# Altium PCB LEDControl1.PcbDoc (part 4 of 6)
Units mm, origin at the board's own origin, x right, y up, seen from the top; angles counter-clockwise.
Board outline 380 x 185 mm, 2 copper layers (Top Layer, Bottom Layer), stack 0.533 mm thick; 673 components, 368 nets, 1993 pads, 2553 vias.
Unrouted connection lines stored in the file: 1155.
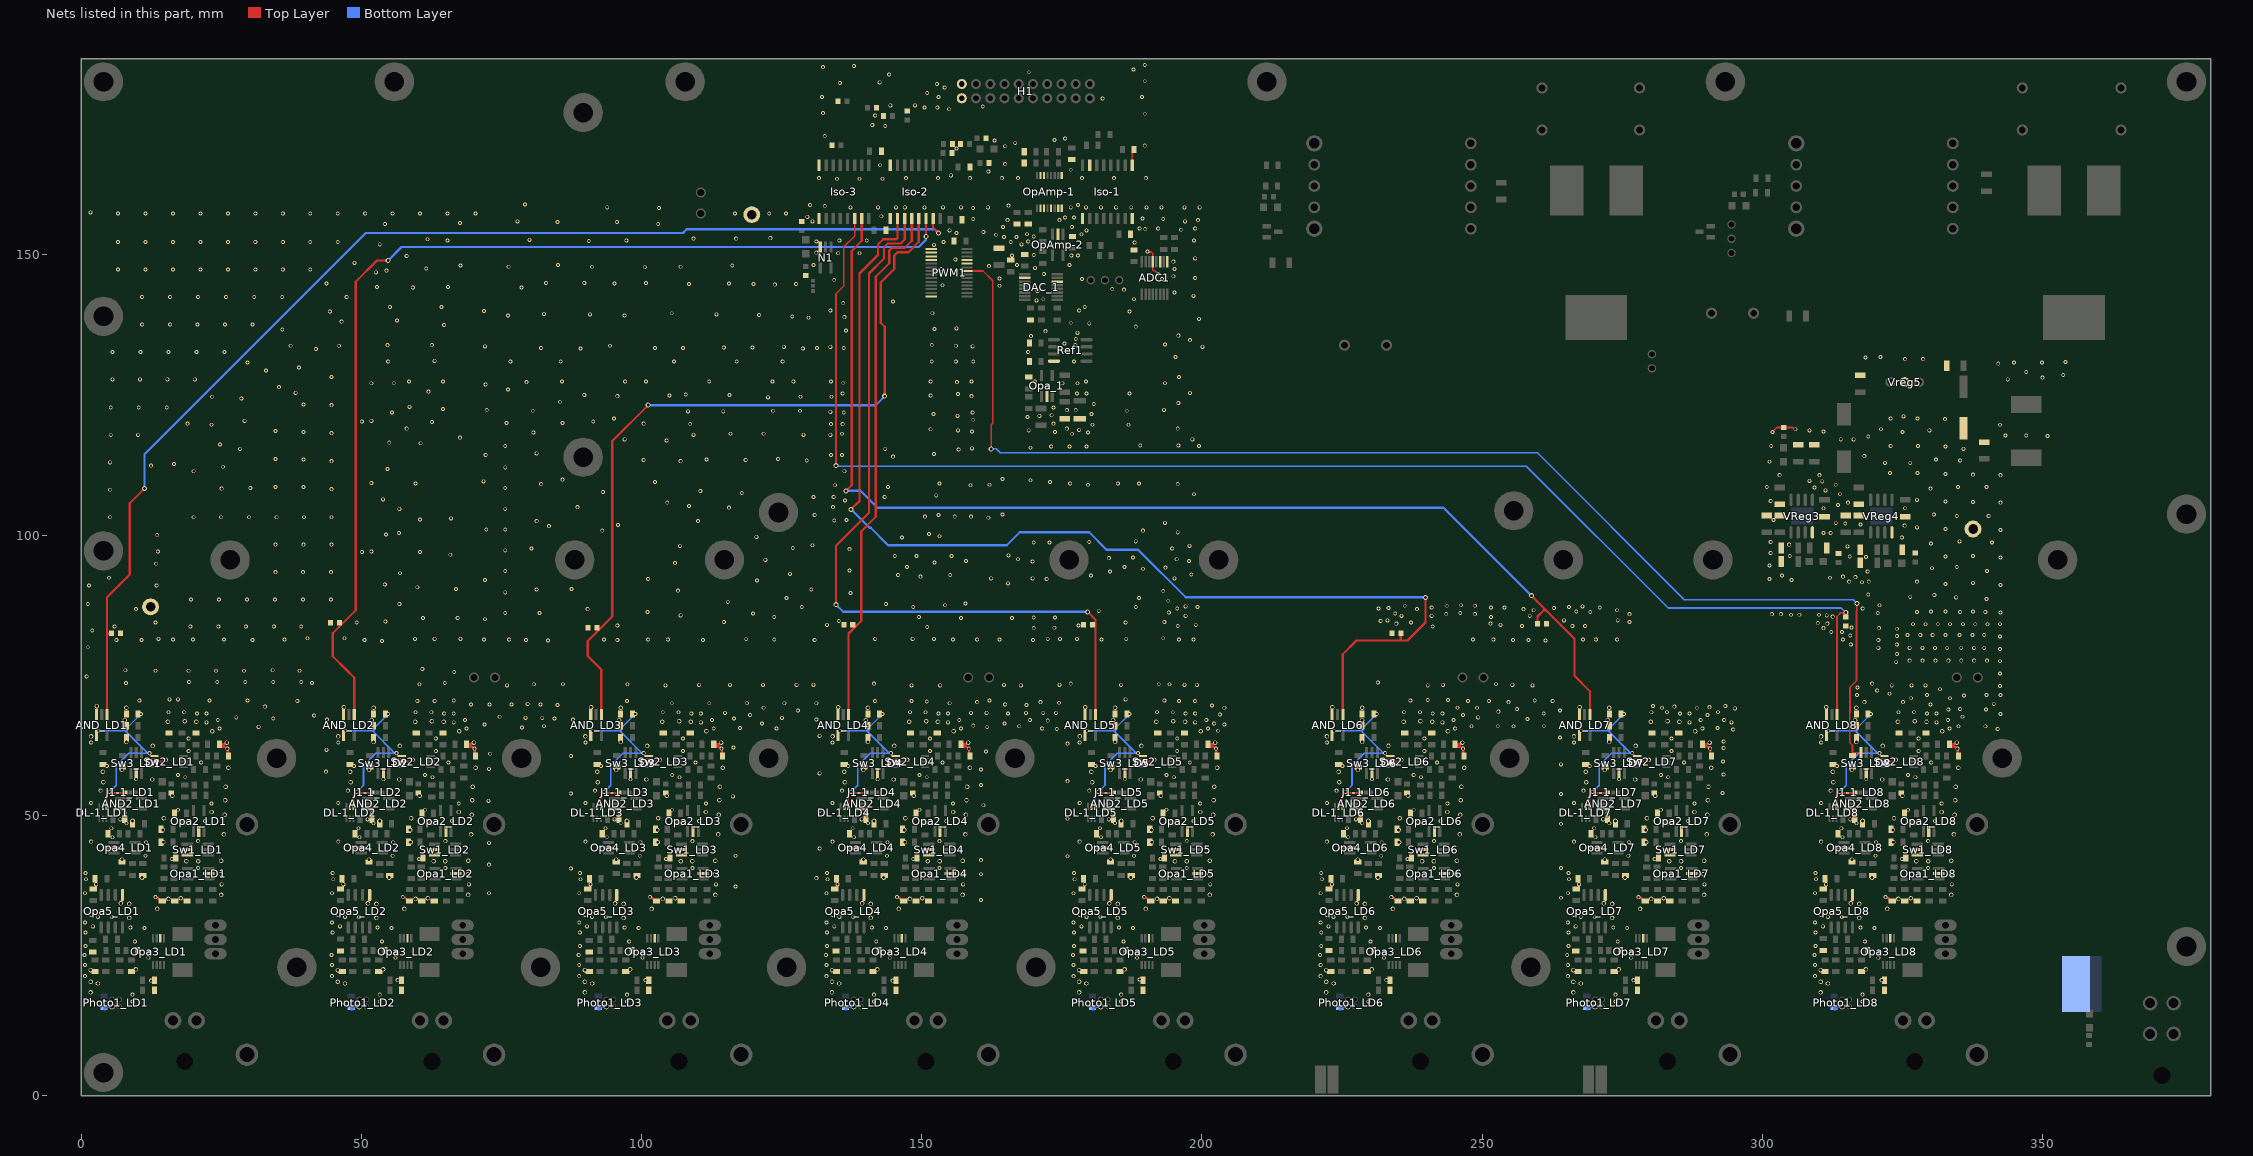
[diagram p4: the nets of this part, all layers, seen from the top]

## Via types
v1: diameter 0.7, hole 0.4, Top Layer to Bottom Layer, tented both sides, 1874 vias
v2: diameter 0.8, hole 0.5, Top Layer to Bottom Layer, tented both sides, 512 vias
v3: diameter 0.9, hole 0.5, Top Layer to Bottom Layer, tented both sides, 158 vias
v4: diameter 1.27, hole 0.711, Top Layer to Bottom Layer, tented both sides, 8 vias
v5: diameter 1.2, hole 0.7, Top Layer to Bottom Layer, tented both sides, 1 vias

## Nets (pads, with @x,y where several pads share a name; then routed paths per layer and width w, separated by ;. In a path a pad name is that pad's centre, name@x,y a point inside that pad or via, vN(x,y) a via of type N, cw(c..) or ccw(c..) an arc to the next point about the centre after c; other vN are vias at no path point) (continued)
DB8: PWM1.22 R7-5_LD8.1 Sw3_LD8.6 | length 230.8
  Top Layer w0.3: PWM1.22@158.1,147.15 160.95,147.15 162.682,145.418 162.682,119.982 162.4,119.7 v3(162.4,115.4) ; R7-5_LD8.1@315.8,60.8 R7-5_LD8.1@315.9,60.9 ; R7-5_LD8.1@316.1,60.8 316.1,61.2 ; v3(316.9,87.8) 316.869,87.769 316.869,86.569 316.8,86.5 316.8,74 315.65,72.85 315.65,68.307 315.6,68.257 315.6,63 316.1,62.5 316.1,61.2 ; Sw3_LD8.6@317.6,61.2 316.1,61.2
  Bottom Layer w0.3: v3(162.4,115.4) 163.3,115.4 164,114.7 259.9,114.7 286.1,88.5 316.2,88.5 v3(316.9,87.8)
EN1: AND_LD1.1 Iso-2.15 RPD_LD1.1 | length 211.6
  Top Layer w0.4: AND_LD1.1@4.634,68.016 4.634,82.4 ; RPD_LD1.1@5.4,82.5 5.3,82.4 4.634,82.4 ; v3(11.3,108.3) 8.7,105.7 8.7,93 4.634,88.934 4.634,82.4 ; Iso-2.15@152.04,156.5 152.04,154.86 v3(153,153.9)
  Bottom Layer w0.4: v3(11.3,108.3) 11.3,114.4 50.8,153.9 107.4,153.9 108.1,154.6 152.3,154.6 v3(153,153.9)
EN2: AND_LD2.1 Iso-2.14 RPD_LD2.1 | length 189.2
  Top Layer w0.4: AND_LD2.1@48.734,68.016 48.734,74.566 47.275,76.025 44.9,78.4 44.9,82.5 46.075,83.675 49,86.6 49,145.2 52.8,149 v3(54.8,149) ; Iso-2.14@150.77,156.5 150.789,156.481 150.789,153.306 v3(150.808,153.287)
  Bottom Layer w0.4: v3(54.8,149) 57.2,151.4 149.489,151.4 150.75,152.66 150.75,153.229 v3(150.808,153.287)
EN3: AND_LD3.1 Iso-2.13 RPD_LD3.1 | length 139.5
  Top Layer w0.4: AND_LD3.1@92.834,68.016 92.834,76.019 90.4,78.453 90.4,81.1 92.075,82.775 94.8,85.5 94.8,116.8 v3(101.2,123.2) ; v3(143.4,124.8) 143.4,137.2 142.7,137.9 142.7,145.1 145.1,147.5 145.1,149.9 145.7,150.5 147.659,150.5 149.5,152.341 Iso-2.13@149.5,156.5
  Bottom Layer w0.4: v3(101.2,123.2) 141.8,123.2 v3(143.4,124.8)
EN4: AND_LD4.1 Iso-2.12 RPD_LD4.1 | length 94.5
  Top Layer w0.4: AND_LD4.1@136.934,68.016 136.934,82.434 139.2,84.7 139.2,100.665 141.8,103.265 141.8,146.112 144.2,148.512 144.2,150.8 144.7,151.3 146.988,151.3 148.23,152.542 Iso-2.12@148.23,156.5
EN5: AND_LD5.1 Iso-2.11 RPD_LD5.1 | length 139.7
  Top Layer w0.4: v3(134.7,87.6) 134.7,98.1 140.6,104 140.6,146.7 143.3,149.4 143.3,151.4 143.952,152.052 146.248,152.052 146.96,152.764 Iso-2.11@146.96,156.5 ; v3(179.617,86.313) 181.034,84.897 AND_LD5.1@181.034,68.016
  Bottom Layer w0.4: v3(134.7,87.6) 135.987,86.313 v3(179.617,86.313)
EN6: AND_LD6.1 Iso-2.10 RPD_LD6.1 | length 201.3
  Top Layer w0.4: v3(137.4,104.6) 138.9,106.1 138.9,146.7 142.2,150 142.2,151.9 143.121,152.821 145.479,152.821 145.69,153.031 Iso-2.10@145.69,156.5 ; AND_LD6.1@225.134,68.016 225.134,78.734 227.6,81.2 235.7,81.2 ; RPD_LD6.1@235.5,82.5 235.5,81.4 235.7,81.2 ; v3(239.9,88.9) 239.9,84.4 236.7,81.2 235.7,81.2
  Bottom Layer w0.4: v3(137.4,104.6) 140.698,101.302 140.898,101.302 144,98.2 165.2,98.2 167.5,100.5 179.9,100.5 183,97.4 188.6,97.4 197.1,88.9 v3(239.9,88.9)
EN7: AND_LD7.1 Iso-3.15 RPD_LD7.1 | length 208.6
  Top Layer w0.4: v3(136.5,107.9) 137.521,108.921 137.521,150.721 139.31,152.51 Iso-3.15@139.31,156.5 ; v3(258.8,89.2) 261.4,86.6 ; RPD_LD7.1@259.9,84.15 RPD_LD7.1@259.9,84.2 259.9,85.5 261,86.6 261.4,86.6 ; AND_LD7.1@269.234,68.016 269.234,72.166 266.5,74.9 266.5,81.5 261.4,86.6
  Bottom Layer w0.4: v3(136.5,107.9) 136.508,107.908 139.092,107.908 142.1,104.9 243.1,104.9 v3(258.8,89.2)
EN8: AND_LD8.1 Iso-3.14 RPD_LD8.1 | length 256.7
  Top Layer w0.3: v3(134.7,112.4) 134.7,143.06 136.1,144.46 136.1,151.436 138.04,153.376 Iso-3.14@138.04,156.5 ; 313.334,69.411 313.334,85.494 314,86.16 314.86,86.16 v3(314.9,86.2) RPD_LD8.1@314.9,85.4
  Top Layer w0.4: AND_LD8.1@313.334,68.016 313.334,69.411
  Bottom Layer w0.3: v3(134.7,112.4) 134.8,112.3 257.9,112.3 283.2,87 314.1,87 v3(314.9,86.2)
Enable_LD1: AND_LD1.4 DL-1_LD1.1 J1-1_LD1.1 R7-6_LD1.1 Sw2_LD1.1 | length 34.5
  Top Layer w0.3: AND_LD1.4@2.7,64.7 v1(3.1,65.1) ; DL-1_LD1.1@4.55,51.6 4.55,53.65 v1(5.1,54.2) 5.208,54.2 5.408,54 J1-1_LD1.1@7.9,54 ; R7-6_LD1.1@10.2,68.1 v1(10.7,68.1) ; v1@12.277,60.823 12.5,60.6 Sw2_LD1.1@13.1,60.6
  Bottom Layer w0.3: v1(3.1,65.1) 7.9,65.1 ; v1(5.1,54.2) 6.3,55.4 6.3,58.9 8.5,61.1 v1@11.9,61.1 ; v1(10.7,68.1) 8.2,65.6 8.2,65.1 7.9,65.1 ; v1(12.2,61.1) v1@11.9,61.1 ; 7.9,65.1 v1@11.9,61.1
Enable_LD2: AND_LD2.4 DL-1_LD2.1 J1-1_LD2.1 R7-6_LD2.1 Sw2_LD2.1 | length 34.5
  Top Layer w0.3: AND_LD2.4@46.8,64.7 v1(47.2,65.1) ; DL-1_LD2.1@48.65,51.6 48.65,53.65 v1(49.2,54.2) 49.308,54.2 49.508,54 J1-1_LD2.1@52,54 ; R7-6_LD2.1@54.3,68.1 v1(54.8,68.1) ; v1@56.377,60.823 56.6,60.6 Sw2_LD2.1@57.2,60.6
  Bottom Layer w0.3: v1(47.2,65.1) 52,65.1 ; v1(49.2,54.2) 50.4,55.4 50.4,58.9 52.6,61.1 v1@56,61.1 ; v1(54.8,68.1) 52.3,65.6 52.3,65.1 52,65.1 ; v1(56.3,61.1) v1@56,61.1 ; 52,65.1 v1@56,61.1
Enable_LD3: AND_LD3.4 DL-1_LD3.1 J1-1_LD3.1 R7-6_LD3.1 Sw2_LD3.1 | length 34.5
  Top Layer w0.3: AND_LD3.4@90.9,64.7 v1(91.3,65.1) ; DL-1_LD3.1@92.75,51.6 92.75,53.65 v1(93.3,54.2) 93.408,54.2 93.608,54 J1-1_LD3.1@96.1,54 ; R7-6_LD3.1@98.4,68.1 v1(98.9,68.1) ; v1@100.477,60.823 100.7,60.6 Sw2_LD3.1@101.3,60.6
  Bottom Layer w0.3: v1(91.3,65.1) 96.1,65.1 ; v1(93.3,54.2) 94.5,55.4 94.5,58.9 96.7,61.1 v1@100.1,61.1 ; v1(98.9,68.1) 96.4,65.6 96.4,65.1 96.1,65.1 ; v1(100.4,61.1) v1@100.1,61.1 ; 96.1,65.1 v1@100.1,61.1
Enable_LD4: AND_LD4.4 DL-1_LD4.1 J1-1_LD4.1 R7-6_LD4.1 Sw2_LD4.1 | length 34.5
  Top Layer w0.3: AND_LD4.4@135,64.7 v1(135.4,65.1) ; DL-1_LD4.1@136.85,51.6 136.85,53.65 v1(137.4,54.2) 137.508,54.2 137.708,54 J1-1_LD4.1@140.2,54 ; R7-6_LD4.1@142.5,68.1 v1(143,68.1) ; v1@144.577,60.823 144.8,60.6 Sw2_LD4.1@145.4,60.6
  Bottom Layer w0.3: v1(135.4,65.1) 140.2,65.1 ; v1(137.4,54.2) 138.6,55.4 138.6,58.9 140.8,61.1 v1@144.2,61.1 ; v1(143,68.1) 140.5,65.6 140.5,65.1 140.2,65.1 ; v1(144.5,61.1) v1@144.2,61.1 ; 140.2,65.1 v1@144.2,61.1
Enable_LD5: AND_LD5.4 DL-1_LD5.1 J1-1_LD5.1 R7-6_LD5.1 Sw2_LD5.1 | length 34.5
  Top Layer w0.3: AND_LD5.4@179.1,64.7 v1(179.5,65.1) ; DL-1_LD5.1@180.95,51.6 180.95,53.65 v1(181.5,54.2) 181.608,54.2 181.808,54 J1-1_LD5.1@184.3,54 ; R7-6_LD5.1@186.6,68.1 v1(187.1,68.1) ; v1@188.677,60.823 188.9,60.6 Sw2_LD5.1@189.5,60.6
  Bottom Layer w0.3: v1(179.5,65.1) 184.3,65.1 ; v1(181.5,54.2) 182.7,55.4 182.7,58.9 184.9,61.1 v1@188.3,61.1 ; v1(187.1,68.1) 184.6,65.6 184.6,65.1 184.3,65.1 ; v1(188.6,61.1) v1@188.3,61.1 ; 184.3,65.1 v1@188.3,61.1
Enable_LD6: AND_LD6.4 DL-1_LD6.1 J1-1_LD6.1 R7-6_LD6.1 Sw2_LD6.1 | length 34.5
  Top Layer w0.3: AND_LD6.4@223.2,64.7 v1(223.6,65.1) ; DL-1_LD6.1@225.05,51.6 225.05,53.65 v1(225.6,54.2) 225.708,54.2 225.908,54 J1-1_LD6.1@228.4,54 ; R7-6_LD6.1@230.7,68.1 v1(231.2,68.1) ; v1@232.777,60.823 233,60.6 Sw2_LD6.1@233.6,60.6
  Bottom Layer w0.3: v1(223.6,65.1) 228.4,65.1 ; v1(225.6,54.2) 226.8,55.4 226.8,58.9 229,61.1 v1@232.4,61.1 ; v1(231.2,68.1) 228.7,65.6 228.7,65.1 228.4,65.1 ; v1(232.7,61.1) v1@232.4,61.1 ; 228.4,65.1 v1@232.4,61.1
Enable_LD7: AND_LD7.4 DL-1_LD7.1 J1-1_LD7.1 R7-6_LD7.1 Sw2_LD7.1 | length 34.5
  Top Layer w0.3: AND_LD7.4@267.3,64.7 v1(267.7,65.1) ; DL-1_LD7.1@269.15,51.6 269.15,53.65 v1(269.7,54.2) 269.808,54.2 270.008,54 J1-1_LD7.1@272.5,54 ; R7-6_LD7.1@274.8,68.1 v1(275.3,68.1) ; v1@276.877,60.823 277.1,60.6 Sw2_LD7.1@277.7,60.6
  Bottom Layer w0.3: v1(267.7,65.1) 272.5,65.1 ; v1(269.7,54.2) 270.9,55.4 270.9,58.9 273.1,61.1 v1@276.5,61.1 ; v1(275.3,68.1) 272.8,65.6 272.8,65.1 272.5,65.1 ; v1(276.8,61.1) v1@276.5,61.1 ; 272.5,65.1 v1@276.5,61.1
Enable_LD8: AND_LD8.4 DL-1_LD8.1 J1-1_LD8.1 R7-6_LD8.1 Sw2_LD8.1 | length 34.5
  Top Layer w0.3: AND_LD8.4@311.4,64.7 v1(311.8,65.1) ; DL-1_LD8.1@313.25,51.6 313.25,53.65 v1(313.8,54.2) 313.908,54.2 314.108,54 J1-1_LD8.1@316.6,54 ; R7-6_LD8.1@318.9,68.1 v1(319.4,68.1) ; v1@320.977,60.823 321.2,60.6 Sw2_LD8.1@321.8,60.6
  Bottom Layer w0.3: v1(311.8,65.1) 316.6,65.1 ; v1(313.8,54.2) 315,55.4 315,58.9 317.2,61.1 v1@320.6,61.1 ; v1(319.4,68.1) 316.9,65.6 316.9,65.1 316.6,65.1 ; v1(320.9,61.1) v1@320.6,61.1 ; 316.6,65.1 v1@320.6,61.1
GND: ADC1.9 ADC1.11 ADC1.13 AND2_LD1.3 AND2_LD2.3 AND2_LD3.3 AND2_LD4.3 AND2_LD5.3 AND2_LD6.3 AND2_LD7.3 AND2_LD8.3 AND_LD1.3 AND_LD2.3 AND_LD3.3 AND_LD4.3 AND_LD5.3 AND_LD6.3 AND_LD7.3 AND_LD8.3 C1-1_LD1.1 C1-1_LD2.1 C1-1_LD3.1 C1-1_LD4.1 C1-1_LD5.1 C1-1_LD6.1 C1-1_LD7.1 C1-1_LD8.1 C1-2.2 C1-4.1 C1-6.1 C1-7.2 C1-10.1 C1-11.1 C1-12.2 C1-13.1 C1-14.2 C1-16.1 C1-99.1 C2-1.2 C2-2.2 C2-3.1 C2-3_LD1.1 C2-3_LD2.1 C2-3_LD3.1 C2-3_LD4.1 C2-3_LD5.1 C2-3_LD6.1 C2-3_LD7.1 C2-3_LD8.1 C2-4.1 C2-4_LD1.1 C2-4_LD2.1 C2-4_LD3.1 C2-4_LD4.1 C2-4_LD5.1 C2-4_LD6.1 C2-4_LD7.1 C2-4_LD8.1 C2-5.1 C2-5_LD1.2 C2-5_LD2.2 C2-5_LD3.2 C2-5_LD4.2 C2-5_LD5.2 C2-5_LD6.2 C2-5_LD7.2 C2-5_LD8.2 C2-6.2 C2-6_LD1.2 C2-6_LD2.2 C2-6_LD3.2 C2-6_LD4.2 C2-6_LD5.2 C2-6_LD6.2 C2-6_LD7.2 C2-6_LD8.2 C2-7.1 C2-7_LD1.2 C2-7_LD2.2 C2-7_LD3.2 C2-7_LD4.2 C2-7_LD5.2 C2-7_LD6.2 C2-7_LD7.2 C2-7_LD8.2 C2-12.2 C2-13.2 C2-14.2 C2-15.2 C2-16.1 C2-17.1 C2-18.1 C2-19.2 C2-20.2 C2-21.2 C2-22.1 C2-23.1 C3-1.2 C3-1_LD1.1 C3-1_LD2.1 C3-1_LD3.1 C3-1_LD4.1 C3-1_LD5.1 C3-1_LD6.1 C3-1_LD7.1 C3-1_LD8.1 C3-2_LD1.2 C3-2_LD2.2 C3-2_LD3.2 C3-2_LD4.2 C3-2_LD5.2 C3-2_LD6.2 C3-2_LD7.2 C3-2_LD8.2 C4-1.2 C4-1_LD1.1 C4-1_LD2.1 C4-1_LD3.1 C4-1_LD4.1 C4-1_LD5.1 C4-1_LD6.1 C4-1_LD7.1 C4-1_LD8.1 C4-2_LD1.1 C4-2_LD2.1 C4-2_LD3.1 C4-2_LD4.1 C4-2_LD5.1 C4-2_LD6.1 C4-2_LD7.1 C4-2_LD8.1 C4-3_LD1.2 C4-3_LD2.2 C4-3_LD3.2 C4-3_LD4.2 C4-3_LD5.2 C4-3_LD6.2 C4-3_LD7.2 C4-3_LD8.2 C4-4_LD1.2 C4-4_LD2.2 C4-4_LD3.2 C4-4_LD4.2 C4-4_LD5.2 C4-4_LD6.2 C4-4_LD7.2 C4-4_LD8.2 C4-5_LD1.2 C4-5_LD2.2 C4-5_LD3.2 C4-5_LD4.2 C4-5_LD5.2 C4-5_LD6.2 C4-5_LD7.2 C4-5_LD8.2 C4-6_LD1.2 C4-6_LD2.2 C4-6_LD3.2 C4-6_LD4.2 C4-6_LD5.2 C4-6_LD6.2 C4-6_LD7.2 C4-6_LD8.2 C4-7_LD1.2 C4-7_LD2.2 C4-7_LD3.2 C4-7_LD4.2 C4-7_LD5.2 C4-7_LD6.2 C4-7_LD7.2 C4-7_LD8.2 C4-8_LD1.2 C4-8_LD2.2 C4-8_LD3.2 C4-8_LD4.2 C4-8_LD5.2 C4-8_LD6.2 C4-8_LD7.2 C4-8_LD8.2 C5-1.1 C5-1_LD1.1 C5-1_LD2.1 C5-1_LD3.1 C5-1_LD4.1 C5-1_LD5.1 C5-1_LD6.1 C5-1_LD7.1 C5-1_LD8.1 CE-7.2 DAC_1.2 DAC_1.14 DL-1_LD1.2 DL-1_LD2.2 DL-1_LD3.2 DL-1_LD4.2 DL-1_LD5.2 DL-1_LD6.2 DL-1_LD7.2 DL-1_LD8.2 Iso-1.9 Iso-1.16 Iso-2.9 Iso-3.9 JG.2 N1.3 Opa1_LD1.2 Opa1_LD2.2 Opa1_LD3.2 Opa1_LD4.2 Opa1_LD5.2 Opa1_LD6.2 Opa1_LD7.2 Opa1_LD8.2 Opa2_LD1.2 Opa2_LD2.2 Opa2_LD3.2 Opa2_LD4.2 Opa2_LD5.2 Opa2_LD6.2 Opa2_LD7.2 Opa2_LD8.2 Opa3_LD1.2 Opa3_LD2.2 Opa3_LD3.2 Opa3_LD4.2 Opa3_LD5.2 Opa3_LD6.2 Opa3_LD7.2 Opa3_LD8.2 Opa4_LD1.2 Opa4_LD2.2 Opa4_LD3.2 Opa4_LD4.2 Opa4_LD5.2 Opa4_LD6.2 Opa4_LD7.2 Opa4_LD8.2 Opa5_LD1.5 Opa5_LD2.5 Opa5_LD3.5 Opa5_LD4.5 Opa5_LD5.5 Opa5_LD6.5 Opa5_LD7.5 Opa5_LD8.5 Opa_1.2 OpAmp-1.2 OpAmp-1.3 OpAmp-1.5 OpAmp-1.7 OpAmp-1.8 OpAmp-2.2 Photo1_LD1.2 Photo1_LD2.2 Photo1_LD3.2 Photo1_LD4.2 Photo1_LD5.2 Photo1_LD6.2 Photo1_LD7.2 Photo1_LD8.2 PWM1.1 PWM1.2 PWM1.3 PWM1.4 PWM1.14 PWM1.24 PWM1.25 R1-5_LD1.1 R1-5_LD2.1 R1-5_LD3.1 R1-5_LD4.1 R1-5_LD5.1 R1-5_LD6.1 R1-5_LD7.1 R1-5_LD8.1 R2-1.2 R2-5.2 R2-6.2 R2-7.2 R3-2_LD1.2 R3-2_LD2.2 R3-2_LD3.2 R3-2_LD4.2 R3-2_LD5.2 R3-2_LD6.2 R3-2_LD7.2 R3-2_LD8.2 R5-1.2 R6-1.1 R7-1.2 R7-1_LD1.2 R7-1_LD2.2 R7-1_LD3.2 R7-1_LD4.2 R7-1_LD5.2 R7-1_LD6.2 R7-1_LD7.2 R7-1_LD8.2 R7-2_LD1.2 R7-2_LD2.2 R7-2_LD3.2 R7-2_LD4.2 R7-2_LD5.2 R7-2_LD6.2 R7-2_LD7.2 R7-2_LD8.2 R7-3_LD1.2 R7-3_LD2.2 R7-3_LD3.2 R7-3_LD4.2 R7-3_LD5.2 R7-3_LD6.2 R7-3_LD7.2 R7-3_LD8.2 R7-4_LD1.2 R7-4_LD2.2 R7-4_LD3.2 R7-4_LD4.2 R7-4_LD5.2 R7-4_LD6.2 R7-4_LD7.2 R7-4_LD8.2 R7-5_LD1.2 R7-5_LD2.2 R7-5_LD3.2 R7-5_LD4.2 R7-5_LD5.2 R7-5_LD6.2 R7-5_LD7.2 R7-5_LD8.2 R7-6_LD1.2 R7-6_LD2.2 R7-6_LD3.2 R7-6_LD4.2 R7-6_LD5.2 R7-6_LD6.2 R7-6_LD7.2 R7-6_LD8.2 R8-1_LD1.2 R8-1_LD2.2 R8-1_LD3.2 R8-1_LD4.2 R8-1_LD5.2 R8-1_LD6.2 R8-1_LD7.2 R8-1_LD8.2 R9-1_LD1.2 R9-1_LD2.2 R9-1_LD3.2 R9-1_LD4.2 R9-1_LD5.2 R9-1_LD6.2 R9-1_LD7.2 R9-1_LD8.2 R9-2_LD1.2 R9-2_LD2.2 R9-2_LD3.2 R9-2_LD4.2 R9-2_LD5.2 R9-2_LD6.2 R9-2_LD7.2 R9-2_LD8.2 R11-1_LD1.2 R11-1_LD2.2 R11-1_LD3.2 R11-1_LD4.2 R11-1_LD5.2 R11-1_LD6.2 R11-1_LD7.2 R11-1_LD8.2 R11-2_LD1.2 R11-2_LD2.2 R11-2_LD3.2 R11-2_LD4.2 R11-2_LD5.2 R11-2_LD6.2 R11-2_LD7.2 R11-2_LD8.2 R13-1_LD1.2 R13-1_LD2.2 R13-1_LD3.2 R13-1_LD4.2 R13-1_LD5.2 R13-1_LD6.2 R13-1_LD7.2 R13-1_LD8.2 Ref1.4 RPD_10.2 RPD_LD1.2 RPD_LD2.2 RPD_LD3.2 RPD_LD4.2 RPD_LD5.2 RPD_LD6.2 RPD_LD7.2 RPD_LD8.2 Sw1_LD1.2 Sw1_LD1.3 Sw1_LD2.2 Sw1_LD2.3 Sw1_LD3.2 Sw1_LD3.3 Sw1_LD4.2 Sw1_LD4.3 Sw1_LD5.2 Sw1_LD5.3 Sw1_LD6.2 Sw1_LD6.3 Sw1_LD7.2 Sw1_LD7.3 Sw1_LD8.2 Sw1_LD8.3 Sw2_LD1.3 Sw2_LD2.3 Sw2_LD3.3 Sw2_LD4.3 Sw2_LD5.3 Sw2_LD6.3 Sw2_LD7.3 Sw2_LD8.3 Sw3_LD1.2 Sw3_LD2.2 Sw3_LD3.2 Sw3_LD4.2 Sw3_LD5.2 Sw3_LD6.2 Sw3_LD7.2 Sw3_LD8.2 T1.1 T2.1 T3.1 VReg3.4 VReg4.4 Vreg5.2 | length 123.2
  Top Layer w0.3: AND_LD1.3@2.75,68 2.775,68.025 2.775,69.475 v2(2.8,69.5) ; 11.8,59.8 12,59.6 Sw2_LD1.3@13.1,59.6 14.665,59.6 14.965,59.9 v2(15.1,59.9) ; 55.9,59.8 56.1,59.6 Sw2_LD2.3@57.2,59.6 58.765,59.6 59.065,59.9 v2(59.2,59.9) ; 100,59.8 100.2,59.6 Sw2_LD3.3@101.3,59.6 102.865,59.6 103.165,59.9 v2(103.3,59.9) ; 144.1,59.8 144.3,59.6 Sw2_LD4.3@145.4,59.6 146.965,59.6 147.265,59.9 v2(147.4,59.9) ; 188.2,59.8 188.4,59.6 Sw2_LD5.3@189.5,59.6 191.065,59.6 191.365,59.9 v2(191.5,59.9) ; v1(190.316,150.611) 190.393,150.535 190.965,150.535 191.25,150.25 ADC1.13@191.25,148.8 191.25,147.376 191.426,147.2 191.6,147.2 191.8,147 ; 232.3,59.8 232.5,59.6 Sw2_LD6.3@233.6,59.6 235.165,59.6 235.465,59.9 v2(235.6,59.9) ; 276.4,59.8 276.6,59.6 Sw2_LD7.3@277.7,59.6 279.265,59.6 279.565,59.9 v2(279.7,59.9) ; v1(301.8,118.4) 302.6,119.2 R2-6.2@303.8,119.2 305.492,119.2 305.792,118.9 v1(305.9,118.9) ; 320.5,59.8 320.7,59.6 Sw2_LD8.3@321.8,59.6 323.365,59.6 323.665,59.9 v2(323.8,59.9)
  Top Layer w0.4: C4-5_LD1.2@2.2,36.9 2.4,36.9 2.65,37.15 2.65,37.65 v1(2.7,37.7) ; v2(7.1,34.3) 7.177,34.377 7.177,34.722 7.4,34.946 Opa5_LD1.5@7.4,35.8 ; v1(13.3,35.4) 13.357,35.343 13.657,35.343 14.3,34.7 C4-1_LD1.1@14.5,34.7 ; v2(26,63) 25.892,63 25.592,62.7 C2-5_LD1.2@24.7,62.7 24.7,62.5 24.95,62.25 25.669,62.25 26.019,61.9 v1(26.1,61.9) 26.157,61.843 26.157,60.743 R8-1_LD1.2@26.3,60.6 ; C4-5_LD2.2@46.3,36.9 46.5,36.9 46.75,37.15 46.75,37.65 v1(46.8,37.7) ; v2(51.2,34.3) 51.277,34.377 51.277,34.722 51.5,34.946 Opa5_LD2.5@51.5,35.8 ; v1(57.4,35.4) 57.457,35.343 57.757,35.343 58.4,34.7 C4-1_LD2.1@58.6,34.7 ; v2(70.1,63) 69.992,63 69.692,62.7 C2-5_LD2.2@68.8,62.7 68.8,62.5 69.05,62.25 69.769,62.25 70.119,61.9 v1(70.2,61.9) 70.257,61.843 70.257,60.743 R8-1_LD2.2@70.4,60.6 ; C4-5_LD3.2@90.4,36.9 90.6,36.9 90.85,37.15 90.85,37.65 v1(90.9,37.7) ; v2(95.3,34.3) 95.377,34.377 95.377,34.722 95.6,34.946 Opa5_LD3.5@95.6,35.8 ; v1(101.5,35.4) 101.557,35.343 101.857,35.343 102.5,34.7 C4-1_LD3.1@102.7,34.7 ; v2(114.2,63) 114.092,63 113.792,62.7 C2-5_LD3.2@112.9,62.7 112.9,62.5 113.15,62.25 113.869,62.25 114.219,61.9 v1(114.3,61.9) 114.357,61.843 114.357,60.743 R8-1_LD3.2@114.5,60.6 ; C4-5_LD4.2@134.5,36.9 134.7,36.9 134.95,37.15 134.95,37.65 v1(135,37.7) ; v2(139.4,34.3) 139.477,34.377 139.477,34.722 139.7,34.946 Opa5_LD4.5@139.7,35.8 ; v1(145.6,35.4) 145.657,35.343 145.957,35.343 146.6,34.7 C4-1_LD4.1@146.8,34.7 ; v2(158.3,63) 158.192,63 157.892,62.7 C2-5_LD4.2@157,62.7 157,62.5 157.25,62.25 157.969,62.25 158.319,61.9 v1(158.4,61.9) 158.457,61.843 158.457,60.743 R8-1_LD4.2@158.6,60.6 ; C4-5_LD5.2@178.6,36.9 178.8,36.9 179.05,37.15 179.05,37.65 v1(179.1,37.7) ; v2(183.5,34.3) 183.577,34.377 183.577,34.722 183.8,34.946 Opa5_LD5.5@183.8,35.8 ; v1(189.7,35.4) 189.757,35.343 190.057,35.343 190.7,34.7 C4-1_LD5.1@190.9,34.7 ; v2(202.4,63) 202.292,63 201.992,62.7 C2-5_LD5.2@201.1,62.7 201.1,62.5 201.35,62.25 202.069,62.25 202.419,61.9 v1(202.5,61.9) 202.557,61.843 202.557,60.743 R8-1_LD5.2@202.7,60.6 ; C4-5_LD6.2@222.7,36.9 222.9,36.9 223.15,37.15 223.15,37.65 v1(223.2,37.7) ; v2(227.6,34.3) 227.677,34.377 227.677,34.722 227.9,34.946 Opa5_LD6.5@227.9,35.8 ; v1(233.8,35.4) 233.857,35.343 234.157,35.343 234.8,34.7 C4-1_LD6.1@235,34.7 ; v2(246.5,63) 246.392,63 246.092,62.7 C2-5_LD6.2@245.2,62.7 245.2,62.5 245.45,62.25 246.169,62.25 246.519,61.9 v1(246.6,61.9) 246.657,61.843 246.657,60.743 R8-1_LD6.2@246.8,60.6 ; C4-5_LD7.2@266.8,36.9 267,36.9 267.25,37.15 267.25,37.65 v1(267.3,37.7) ; v2(271.7,34.3) 271.777,34.377 271.777,34.722 272,34.946 Opa5_LD7.5@272,35.8 ; v1(277.9,35.4) 277.957,35.343 278.257,35.343 278.9,34.7 C4-1_LD7.1@279.1,34.7 ; v2(290.6,63) 290.492,63 290.192,62.7 C2-5_LD7.2@289.3,62.7 289.3,62.5 289.55,62.25 290.269,62.25 290.619,61.9 v1(290.7,61.9) 290.757,61.843 290.757,60.743 R8-1_LD7.2@290.9,60.6 ; C4-5_LD8.2@310.9,36.9 311.1,36.9 311.35,37.15 311.35,37.65 v1(311.4,37.7) ; v2(315.8,34.3) 315.877,34.377 315.877,34.722 316.1,34.946 Opa5_LD8.5@316.1,35.8 ; v1(322,35.4) 322.057,35.343 322.357,35.343 323,34.7 C4-1_LD8.1@323.2,34.7 ; v2(334.7,63) 334.592,63 334.292,62.7 C2-5_LD8.2@333.4,62.7 333.4,62.5 333.65,62.25 334.369,62.25 334.719,61.9 v1(334.8,61.9) 334.857,61.843 334.857,60.743 R8-1_LD8.2@335,60.6
  Bottom Layer w0.4: C4-4_LD1.2@4.1,15.4 4.3,15.4 4.685,15.785 5.435,15.785 Photo1_LD1.2@5.55,15.9 ; C4-4_LD2.2@48.2,15.4 48.4,15.4 48.785,15.785 49.535,15.785 Photo1_LD2.2@49.65,15.9 ; C4-4_LD3.2@92.3,15.4 92.5,15.4 92.885,15.785 93.635,15.785 Photo1_LD3.2@93.75,15.9 ; C4-4_LD4.2@136.4,15.4 136.6,15.4 136.985,15.785 137.735,15.785 Photo1_LD4.2@137.85,15.9 ; C4-4_LD5.2@180.5,15.4 180.7,15.4 181.085,15.785 181.835,15.785 Photo1_LD5.2@181.95,15.9 ; C4-4_LD6.2@224.6,15.4 224.8,15.4 225.185,15.785 225.935,15.785 Photo1_LD6.2@226.05,15.9 ; C4-4_LD7.2@268.7,15.4 268.9,15.4 269.285,15.785 270.035,15.785 Photo1_LD7.2@270.15,15.9 ; C4-4_LD8.2@312.8,15.4 313,15.4 313.385,15.785 314.135,15.785 Photo1_LD8.2@314.25,15.9
  other v1: 9.2,16.8 53.3,16.8 97.4,16.8 141.5,16.8 185.6,16.8 229.7,16.8 273.8,16.8 317.9,16.8 9.2,18 53.3,18 97.4,18 141.5,18 185.6,18 229.7,18 273.8,18 317.9,18 12.5,20.5 144.8,20.5 56.5,20.6 100.7,20.6 232.9,20.6 277,20.6 321.3,20.6 188.9,20.7 0.7,21.3 44.8,21.3 88.9,21.3 133,21.3 177.1,21.3 221.2,21.3 265.3,21.3 309.4,21.3 0.7,23.3 44.8,23.3 88.9,23.3 133,23.3 177.1,23.3 221.2,23.3 265.3,23.3 309.4,23.3 12,24.6 56.1,24.6 100.2,24.6 144.3,24.6 188.4,24.6 232.5,24.6 276.6,24.6 320.7,24.6 0.6,25.1 44.7,25.1 88.8,25.1 132.9,25.1 177,25.1 221.1,25.1 265.2,25.1 309.3,25.1 12,25.5 56.1,25.5 100.2,25.5 144.3,25.5 188.4,25.5 232.5,25.5 276.6,25.5 320.7,25.5 0.8,26.7 89,26.7 133.1,26.7 177.2,26.7 221.3,26.7 265.4,26.7 309.5,26.7 9.6,27.5 53.7,27.5 97.8,27.5 141.9,27.5 186,27.5 230.1,27.5 274.2,27.5 318.3,27.5 0.8,29.1 44.9,29.1 89,29.1 133.1,29.1 177.2,29.1 221.3,29.1 265.4,29.1 309.5,29.1 11.3,29.9 55.4,29.9 99.5,29.9 143.6,29.9 187.7,29.9 231.8,29.9 275.9,29.9 320,29.9 8.8,30 52.9,30 97,30 141.1,30 185.2,30 229.3,30 273.4,30 317.5,30 2.1,30.2 46.2,30.2 90.3,30.2 134.4,30.2 178.5,30.2 222.6,30.2 266.7,30.2 310.8,30.2 0.7,30.9 44.8,30.9 88.9,30.9 133,30.9 177.1,30.9 221.2,30.9 265.3,30.9 309.4,30.9 3,31.9 5.5,31.9 47.1,31.9 49.6,31.9 91.2,31.9 93.7,31.9 135.3,31.9 137.8,31.9 179.4,31.9 181.9,31.9 223.5,31.9 226,31.9 267.6,31.9 270.1,31.9 311.7,31.9 314.2,31.9 160.6,34.9 264.1,35.3 0.7,36.1 44.8,36.1 72.8,36.1 88.9,36.1 133,36.1 177.1,36.1 221.2,36.1 265.3,36.1 309.4,36.1 116.8,37.3 25.1,37.7 69.2,37.7 113.3,37.7 157.4,37.7 201.5,37.7 245.6,37.7 289.7,37.7 333.8,37.7 0.9,38.6 45,38.6 89.1,38.6 133.2,38.6 177.3,38.6 221.4,38.6 265.5,38.6 309.6,38.6 131.2,38.8 160.6,39.5 0.8,39.7 44.9,39.7 89,39.7 133.1,39.7 177.2,39.7 221.3,39.7 265.4,39.7 309.5,39.7 87.4,40.5 20.9,40.6 65,40.6 109.1,40.6 153.2,40.6 197.3,40.6 241.4,40.6 264.1,40.6 285.5,40.6 329.6,40.6 72.8,41.2 160.6,42 16.2,42.2 60.3,42.2 104.4,42.2 148.5,42.2 192.6,42.2 236.7,42.2 280.8,42.2 324.9,42.2 176,42.7 11.5,42.8 55.6,42.8 99.7,42.8 116.8,42.8 143.8,42.8 187.9,42.8 232,42.8 276.1,42.8 320.2,42.8 131.8,44.1 72.8,45.1 11.6,45.2 55.7,45.2 99.8,45.2 143.9,45.2 188,45.2 232.1,45.2 276.2,45.2 320.3,45.2 1.8,45.3 45.9,45.3 90,45.3 134.1,45.3 178.2,45.3 222.3,45.3 266.4,45.3 310.5,45.3 20.9,45.4 65,45.4 109.1,45.4 153.2,45.4 197.3,45.4 241.4,45.4 285.5,45.4 329.6,45.4 5.6,46.1 49.7,46.1 93.8,46.1 137.9,46.1 182,46.1 226.1,46.1 270.2,46.1 314.3,46.1 5.4,47.7 49.5,47.7 93.6,47.7 137.7,47.7 181.8,47.7 225.9,47.7 270,47.7 314.1,47.7 264.1,48.5 8.1,48.6 52.2,48.6 96.3,48.6 140.4,48.6 184.5,48.6 228.6,48.6 272.7,48.6 316.8,48.6 22.1,49 66.2,49 110.3,49 154.4,49 198.5,49 242.6,49 286.7,49 330.8,49 7,49.3 51.1,49.3 95.2,49.3 139.3,49.3 183.4,49.3 227.5,49.3 271.6,49.3 315.7,49.3 176,49.4 7.8,50.4 51.9,50.4 96,50.4 140.1,50.4 184.2,50.4 228.3,50.4 272.4,50.4 316.5,50.4 131.8,50.8 17.3,51 61.4,51 105.5,51 149.6,51 193.7,51 237.8,51 281.9,51 326,51 161,51.8 23.3,52.1 67.4,52.1 111.5,52.1 155.6,52.1 199.7,52.1 243.8,52.1 287.9,52.1 332,52.1 1.8,52.2 45.9,52.2 90,52.2 134.1,52.2 178.2,52.2 222.3,52.2 266.4,52.2 310.5,52.2 72.7,52.6 116.3,53.4 264.1,53.8 87.4,53.9 292.9,54 3.5,54.4 47.6,54.4 91.7,54.4 135.8,54.4 179.9,54.4 224,54.4 268.1,54.4 312.2,54.4 160.6,55.4 176,56.1 9.842,56.44 53.942,56.44 98.042,56.44 142.142,56.44 186.242,56.44 230.342,56.44 274.442,56.44 318.542,56.44 18.6,56.8 62.7,56.8 106.8,56.8 150.9,56.8 195,56.8 239.1,56.8 283.2,56.8 327.3,56.8 17.294,57.191 61.394,57.191 105.494,57.191 149.594,57.191 193.694,57.191 237.794,57.191 281.894,57.191 325.994,57.191 293.1,57.3 131.8,57.5 43.7,57.8 160.6,58.2 72.8,58.3 4.6,58.8 48.7,58.8 92.8,58.8 136.9,58.8 181,58.8 225.1,58.8 269.2,58.8 313.3,58.8 264.1,59.1 21.437,59.454 65.537,59.454 109.637,59.454 153.737,59.454 197.837,59.454 241.937,59.454 286.037,59.454 330.137,59.454 293,59.6 87.4,60.6 73,61 161.5,61.4 19.2,61.5 63.3,61.5 107.4,61.5 151.5,61.5 195.6,61.5 239.7,61.5 283.8,61.5 327.9,61.5 43.8,61.7 293.1,62 116.4,62.1 176,62.8 1.8,63 45.9,63 90,63 134.1,63 178.2,63 222.3,63 266.4,63 310.5,63 293.1,63.2 19.2,63.7 63.3,63.7 107.4,63.7 151.5,63.7 195.6,63.7 239.7,63.7 283.8,63.7 327.9,63.7 263.9,63.9 131.8,64.2 202.9,65.1 294.8,65.3 174.1,65.4 342,65.4 24.7,65.5 68.8,65.5 112.9,65.5 124.1,65.5 157,65.5 171.5,65.5 201.1,65.5 245.2,65.5 289.3,65.5 333.4,65.5 117.6,65.6 292,65.6 78.7,65.7 31.7,65.8 161.7,65.8 82.6,65.9 167.4,65.9 248.1,65.9 252.8,65.9 255.6,65.9 261,65.9 335,65.9 339.8,65.9 159.2,66 72,66.2 204,66.2 121.5,66.4 164.8,66.4 202.2,66.4 220.2,66.4 22.4,66.6 66.5,66.6 110.6,66.6 154.7,66.6 198.8,66.6 242.9,66.6 287,66.6 294.5,66.6 331.1,66.6 172.5,66.9 24.4,67 68.5,67 112.6,67 156.7,67 169.3,67 200.8,67 244.9,67 289,67 293.2,67 333.1,67 43.9,67.1 87.8,67.1 131.2,67.1 258.1,67.2 34.3,67.3 84.5,67.3 116.5,67.3 79.3,67.4 82.3,67.4 125.1,67.4 27.7,67.5 249.3,67.5 74.7,67.6 335.7,67.6 41.6,67.8 119.4,67.9 246.6,67.9 290.2,67.9 203.2,68 342.5,68.1 20.7,68.2 22.4,68.2 64.8,68.2 66.5,68.2 108.9,68.2 110.6,68.2 153,68.2 154.7,68.2 165.4,68.2 197.1,68.2 198.8,68.2 241.2,68.2 242.9,68.2 261,68.2 285.3,68.2 287,68.2 329.4,68.2 331.1,68.2 114.9,68.3 158.8,68.3 161.6,68.3 168.6,68.3 171.7,68.3 174,68.3 15.6,68.4 18.4,68.4 59.7,68.4 62.5,68.4 103.8,68.4 106.6,68.4 147.9,68.4 150.7,68.4 192,68.4 194.8,68.4 236.1,68.4 238.9,68.4 280.2,68.4 283,68.4 292.1,68.4 324.3,68.4 327.1,68.4 252.9,68.5 127.9,68.7 263.9,68.7 333.2,68.9 339.9,68.9 256.2,69 335.3,69 295.1,69.1 121.8,69.2 204,69.2 245.6,69.2 249.1,69.2 282.1,69.2 288.3,69.2 290.6,69.3 32.8,69.4 284.3,69.4 280.5,69.5 293.4,69.5 201.8,69.6 85,69.7 168.7,69.7 69.6,69.8 72.9,69.8 76.8,69.8 82,69.8 164.9,69.8 330,69.8 79.7,69.9 341.3,69.9 105.4,70 112.1,70 118.8,70 125.5,70 131.2,70 155,70 174.5,70.1 159.9,70.2 171.2,70.2 254.7,70.2 318.2,70.2 325.1,70.2 150.9,70.3 38.6,70.4 60,70.4 63.1,70.4 97.4,70.4 141.7,70.4 148.2,70.4 195.9,70.4 198.8,70.4 247.5,70.4 251.2,70.4 262.6,70.4 10.4,70.5 22.9,70.5 29.7,70.5 66.5,70.5 162.1,70.5 193.3,70.5 237.2,70.5 259.4,70.5 240.3,70.6 243.9,70.6 15.8,70.7 17.3,70.7 186.4,70.7 326.5,70.9 333.5,70.9 336,71.4 316.9,71.5 329.4,71.5 340,71.5 342.5,71.5 322.7,71.7 320.5,72.3 331.7,72.5 317,72.8 342.4,73.1 76,73.2 104.3,73.2 148.2,73.2 153.3,73.2 167.7,73.2 240.3,73.2 259,73.2 323.1,73.2 326.6,73.2 329.1,73.2 110.3,73.3 115.8,73.3 121.7,73.3 127.7,73.3 130.7,73.3 164.7,73.3 174.6,73.3 185.6,73.3 196.9,73.3 199.1,73.3 243,73.3 255.4,73.3 60.4,73.4 80.8,73.4 86,73.4 97.5,73.4 192.3,73.4 194.2,73.4 252.5,73.4 141.5,73.5 176.6,73.5 319.6,73.5 8,73.6 41.2,73.6 64.9,73.6 231.395,73.72 19.3,73.8 24.3,73.8 29.3,73.8 34.3,73.8 39.3,73.8 1,74.8 342.4,75.3 66.6,75.6 13.3,75.8 19.2,75.8 24.1,75.8 29.1,75.8 39,75.8 7.9,75.9 34.2,75.9 60.9,76.1 323.9,77.4 342.4,77.5 326.3,77.6 328.6,77.6 330.9,77.6 333.2,77.6 335.5,77.6 337.8,77.6 340.1,77.6 324,78.8 342.4,79.7 320.7,79.9 326.3,79.9 328.6,79.9 330.8,79.9 333,79.9 335.5,79.9 337.8,79.9 339.6,79.9 1.2,80 315.8,80.5 324,80.5 53.7,81.1 83.3,81.2 261.3,81.2 6.3,81.3 10.8,81.3 30.6,81.3 50.6,81.3 79.4,81.3 95.7,81.3 111,81.3 130.9,81.3 169.9,81.3 255.5,81.3 258.3,81.3 320.7,81.3 16.4,81.4 20,81.4 25.5,81.4 36.3,81.4 71.9,81.4 76.4,81.4 93.3,81.4 101.2,81.4 104.7,81.4 123.7,81.4 155.6,81.4 159.9,81.4 163.9,81.4 182.1,81.4 195.9,81.4 198.5,81.4 248.4,81.4 252,81.4 268,81.4 270.3,81.4 274.1,81.4 314.4,81.4 13.8,81.5 59.6,81.5 63.1,81.5 67.7,81.5 118.7,81.5 141.7,81.5 148.4,81.5 152.2,81.5 172.5,81.5 174.7,81.5 177.7,81.5 186.5,81.5 40.4,81.6 47,81.6 193.1,81.6 342.4,81.9 324,82 315.7,82.1 325.9,82.2 328.2,82.2 330.4,82.2 332.7,82.2 335.2,82.2 337.5,82.2 339.6,82.2 312.3,82.7 314.2,82.7 2,83 324,83.3 170,83.4 310.9,83.4 320.8,83.4 173.668,83.485 315.9,83.5 151,83.6 6,83.7 19.5,83.7 24.5,83.7 29.4,83.7 34.4,83.7 39.3,83.7 241.2,83.7 195.7,83.8 257.1,83.8 266.1,83.8 268.4,83.8 95.7,83.9 178,83.9 133.1,84 198.9,84 253.3,84 326.9,84.1 329.1,84.1 331.3,84.1 333.5,84.1 335.8,84.1 338,84.1 340.2,84.1 342.4,84.1 234.7,84.2 251.5,84.2 311.6,84.2 309.9,84.3 13.3,84.4 49.2,84.4 186.4,84.4 237.3,84.4 114.7,84.5 193.3,84.5 276.3,84.5 54.3,84.6 135.2,84.7 231.9,84.7 233.1,84.8 264.6,84.8 274.2,84.8 72.1,85 61,85.2 67.2,85.2 157,85.2 166.1,85.2 170,85.3 173.8,85.3 123.7,85.4 149.5,85.4 251.6,85.4 312.558,85.452 197.1,85.6 235.6,85.6 241,85.6 258.5,85.6 107,85.7 311.5,85.7 305.1,85.8 306.6,85.8 310.1,85.8 243.6,85.9 248.7,85.9 276.3,85.9 301.7,85.9 303.3,85.9 119.9,86 234.5,86 75.7,86.1 81.8,86.1 246.1,86.1 320.6,86.1 194.1,86.2 342.5,86.2 101.1,86.3 269.3,86.3 327.6,86.3 335.3,86.3 339.8,86.3 266.8,86.4 330.1,86.4 332.7,86.4 337.6,86.4 181.6,86.5 259.2,86.6 274.1,86.6 9.8,86.8 90.4,86.8 238.4,86.8 257.4,86.8 195.6,86.9 231.5,86.9 317.905,86.905 233.3,87 262.8,87 241,87.1 251.6,87.1 254,87.1 271,87.1 128.6,87.2 148.5,87.2 188.2,87.2 199.2,87.2 265.5,87.2 197.1,87.3 267.9,87.3 236.2,87.4 243.7,87.4 248.7,87.4 154.2,87.5 246.2,87.5 320.9,87.5 1.2,87.7 56.8,87.7 143.6,87.7 157.8,87.8 115.4,88.1 194,88.3 19.6,88.5 24.6,88.5 29.6,88.5 34.6,88.5 39.6,88.5 44.6,88.5 340,88.6 125.9,88.8 188.8,88.8 334.6,88.9 326.4,89 330.7,89.3 318.9,89.4 137.3,89.7 75.7,89.8 193.1,90 106.5,90.1 81.3,90.3 130.3,90.3 66.9,90.4 87.5,90.4 60,90.7 1.4,91 13.5,91 342.5,91.1 54.2,91.2 332.7,91.3 165.4,91.4 337.6,91.5 317.8,91.6 315.5,91.7 319,91.7 327.6,91.7 120.6,91.9 72.1,92 305.2,92 101.2,92.2 172.3,92.2 301.3,92.2 162.4,92.3 169.8,92.3 195.1,92.3 5,92.4 312.1,92.4 316.6,92.5 149.8,92.6 314.4,92.6 180.2,92.8 303.5,92.8 145.8,92.9 155.1,92.9 198.1,93 126.5,93.1 56.9,93.2 34.7,93.4 39.6,93.4 44.6,93.4 183.6,93.5 318.8,93.5 75.7,93.6 340.1,93.6 137.1,93.7 189.5,94 330.3,94.1 193.5,94.2 147.4,94.3 186.2,94.3 334.7,94.3 301.3,94.6 13.4,94.9 106,95 152.3,95.1 169.8,95.3 157.9,95.4 197.7,95.4 122.1,95.6 167.2,95.7 195.5,95.7 183.4,95.9 187.7,96 342.5,96 318.5,96.1 315.6,96.2 332.7,96.2 145.2,96.3 149.1,96.3 155.3,96.3 304.9,96.3 337.6,96.3 165.5,96.4 65.9,96.5 301.5,96.8 50.1,97 60.5,97 13.7,97.1 51.8,97.1 75.7,97.3 137.1,97.5 80.4,97.6 194.7,97.6 127,97.7 315.2,98 106.9,98.1 197.8,98.1 130.5,98.2 34.7,98.3 39.7,98.3 44.7,98.3 304.8,98.3 330.1,98.5 170,98.7 172.8,98.7 341,98.7 179.9,98.8 301.5,98.8 188.2,98.9 335.2,98.9 146.5,99.6 324.9,99.6 120.5,99.7 153.2,99.8 13.6,100 54.4,100.1 151.3,100.2 56.7,100.4 310.9,100.4 312.2,100.4 195.7,100.5 93,100.8 189.5,100.8 342.5,100.9 72.3,101 75.7,101 332.7,101.1 327.6,101.4 83.5,101.6 325.4,101.7 95.8,101.8 317.5,101.9 314.8,102.1 193.4,102.2 313.1,102.2 81.3,102.5 110.1,102.5 134.4,102.6 136.6,102.7 302,102.7 60.5,102.8 66,103 161.9,103.1 5.2,103.2 20.1,103.2 25,103.2 30,103.2 34.9,103.2 39.8,103.2 44.7,103.2 150.6,103.3 155.9,103.3 158.8,103.3 334.7,103.4 340.4,103.4 130.9,103.6 153,103.6 164.4,103.7 330.6,103.7 56.8,104.7 75.7,104.7 310.9,104.8 325.5,104.8 115.6,104.9 88.6,105 134.2,105 108.5,105.2 313.5,105.4 104.6,105.8 315.3,105.8 342.5,105.8 337.6,105.9 332.7,106 301.5,106.1 136.3,106.2 327.6,106.3 53.9,106.4 130.7,106.8 134.3,106.8 143.4,106.8 152.6,107.1 198.6,107.3 313.9,107.3 117.9,107.5 93.1,107.7 110.5,107.9 311.3,108 5.2,108.1 44.7,108.2 25.1,108.3 330,108.3 30.2,108.4 75.7,108.4 309.3,108.5 34.7,108.6 39.7,108.6 144,108.6 300.8,108.6 334.9,108.6 340,108.6 134.5,108.9 158.7,108.9 162.1,109 179.7,109 313.1,109 82.1,109.1 195.7,109.1 59.7,109.2 153.2,109.2 176.5,109.2 185,109.2 188.8,109.2 51.8,109.3 102.4,109.5 172.9,109.5 71.8,109.6 310.7,109.6 308.4,109.7 169.4,109.8 85.9,109.9 164.4,110 303.1,110.7 310.2,110.7 342.5,110.7 337.6,110.8 332.7,110.9 322.8,111.1 327.7,111.1 20.1,111.4 136.2,111.4 54.7,111.8 75.7,112.1 25.3,112.2 12.5,112.4 16.6,112.7 321.9,112.9 326.4,112.9 5.2,113 301.3,113.1 44.7,113.2 107,113.2 129.5,113.3 335.3,113.3 100.4,113.4 118.6,113.4 39.7,113.5 111.6,113.5 331,113.5 34.7,113.6 124.4,113.6 144.9,114 318.2,114.1 72.2,114.3 133.8,114.3 135.8,114.3 152.2,114.5 81.3,114.6 156.6,115.3 28.4,115.4 143.5,115.4 335.9,115.4 159,115.5 169.4,115.6 173.1,115.8 176.4,115.8 179.4,115.8 332.7,115.8 75.7,115.9 199.5,115.9 301.6,115.9 322.9,115.9 327.8,115.9 189,116 195.8,116 24.8,116.2 60.6,116.4 55,116.5 104.5,116.9 97,117.1 198.3,117.1 314,117.1 316.3,117.1 67.6,117.4 318.9,117.6 350.9,117.7 343.4,117.8 347.1,117.8 5.3,117.9 10.2,117.9 109.3,117.9 128.9,117.9 133.7,117.9 115.9,118.1 121.8,118.1 135.8,118.1 176.8,118.1 44.7,118.2 80.7,118.3 179.7,118.3 39.7,118.4 173.8,118.4 325,118.4 159,118.5 310.9,118.5 34.7,118.6 156.5,118.7 169.1,118.7 308.4,118.7 329.8,118.7 178.1,118.8 151.6,118.9 321.2,118.9 58.1,119 175.9,119 195.7,119 23.3,119.7 180.5,119.7 186.9,119.7 342.4,119.7 108.7,119.8 133.8,119.8 135.9,119.8 19,119.9 100.4,119.9 173.5,119.9 75.9,120 85.9,120 62.6,120.2 50.1,120.3 91.4,120.3 29.2,120.4 51.8,120.4 159.2,120.6 332.6,120.7 95.1,120.8 322.9,120.8 327.7,120.8 168.9,121.1 325.2,121.2 156.4,121.3 171,121.3 173.2,121.4 152.1,121.6 180.3,121.6 55.5,121.9 136.1,121.9 159.1,121.9 133.7,122 108.3,122.1 114.6,122.1 80.6,122.2 123.5,122.2 128.3,122.2 186.6,122.2 72.4,122.3 175.9,122.3 177.5,122.3 193.237,122.367 64.6,122.5 5.3,122.8 10.3,122.8 15.3,122.8 173.5,122.8 58.6,122.9 44.7,123.2 39.7,123.3 180.7,123.4 195.8,123.6 85.5,123.8 28.6,124.4 122.6,124.6 23.4,124.7 128.4,124.7 133.9,124.7 95.7,124.8 158.9,124.8 105,124.9 151.6,124.9 89.8,125 115.7,125 107.9,125.1 156.5,125.2 135.9,125.3 177.7,125.3 179.4,125.3 187.1,125.3 38.3,125.4 197.9,125.4 62,125.6 76.2,126 35.3,126.4 72.2,126.9 51.8,127.1 55.8,127.1 175.1,127.1 177.8,127.1 193.4,127.1 136,127.2 79.5,127.3 156.3,127.3 58.5,127.4 64.6,127.4 85.8,127.4 97.1,127.4 100.8,127.4 112.1,127.4 123.4,127.4 127.1,127.4 133.8,127.4 151.6,127.4 158.9,127.4 170.2,127.4 179.3,127.4 5.6,127.8 10.5,127.8 15.4,127.8 20.3,127.8 343.8,127.8 350,128.1 44.7,128.2 195.9,128.2 353.7,128.6 347.1,129.1 33,129.4 38.9,129.9 342.1,130.6 29.7,130.8 344.9,130.8 349.9,130.8 354.1,130.9 54.8,131 76.6,131 85.6,131 105.8,131 117,131 125.2,131 151.8,131 156.1,131 159.2,131 177.2,131 63.1,131.1 325.5,131.4 328.7,131.4 318.4,131.7 195.3,131.8 321.1,131.8 5.6,132.7 10.6,132.7 15.6,132.7 20.6,132.7 25.6,132.7 169,132.7 175.4,133 41.9,133.2 89.1,133.3 128.8,133.3 82.1,133.4 102.4,133.4 107.4,133.4 131.3,133.4 136.1,133.4 114.7,133.5 119.8,133.5 125.4,133.6 133.7,133.6 200.1,133.6 72.1,133.7 159.1,133.7 37.4,133.8 46,133.8 94.4,133.8 156.1,133.8 54.7,133.9 62.6,133.9 151.8,133.9 177.4,133.9 193.4,134 175.5,134.2 197.9,134.8 177.5,135 169.5,135.5 195.8,135.6 177.8,136.1 172.1,136.4 136.5,136.5 35.9,136.7 152.3,136.8 156.2,136.9 188.2,137.2 64.8,137.5 10.9,137.6 15.9,137.6 20.8,137.6 25.7,137.6 30.6,137.6 179.9,137.8 176.6,137.9 46.5,138.1 56.4,138.3 199.5,138.6 129.8,138.8 136.2,138.9 126.9,139 76.2,139.2 97,139.2 121,139.3 90.8,139.4 113.4,139.4 82.6,139.5 105.4,139.6 151.9,139.6 44.4,139.9 187.1,139.9 71.9,140 133.7,140.1 178.1,140.1 55.1,140.7 64.3,140.7 179.1,140.7 136,141.4 144.9,141.7 170.5,141.9 171.7,142.1 187.9,142.1 10.9,142.5 15.9,142.5 20.9,142.5 25.9,142.5 30.9,142.5 35.9,142.5 47.4,142.5 198.5,142.7 195.1,143.3 170.7,143.6 186.1,143.8 184,143.9 59.2,144.2 78.6,144.2 52.8,144.3 65.5,144.3 163.9,144.5 153.7,144.6 123.8,144.7 108.5,144.8 120,144.8 127.6,144.8 43.8,144.9 95.2,144.9 115.6,144.9 83,145 89.8,145 100.8,145 134.4,145.5 178.6,145.7 192.9,145.7 163.9,145.8 198.8,145.9 194.9,146.2 171.8,146.6 192.2,146.6 52.6,146.9 54.5,147.2 6.6,147.4 11.5,147.4 16.4,147.4 21.3,147.4 26.2,147.4 31.1,147.4 36,147.4 40.9,147.4 153.5,147.5 195.1,147.5 61.6,147.6 170.2,147.7 100.6,147.8 76.3,147.9 91.2,147.9 107,147.9 162,148 67.7,148.1 116.2,148.1 85.1,148.2 130.7,148.2 167,148.2 176.4,148.2 48.8,148.6 194.9,148.8 156,149.2 198.8,149.4 58.1,149.8 166.1,149.9 176.7,149.9 177.9,149.9 170,150 135.1,150.3 138.9,150.3 131.2,150.4 152.2,151.8 173.3,151.8 53.3,151.9 167.8,151.9 188,152.2 6.6,152.3 11.5,152.3 16.4,152.3 21.3,152.3 26.2,152.3 31.1,152.3 36,152.3 40.9,152.3 45.8,152.3 153.9,152.3 165.9,152.3 131.2,152.4 169,152.4 90.6,152.5 65.4,152.6 97.3,152.6 135.3,152.6 140.2,152.6 198.6,152.6 80,152.7 61.8,152.8 109.3,152.9 116.9,152.9 123,153 164.7,153.2 166.9,153.2 170,153.3 163.3,153.6 168.8,153.7 178.5,153.7 156.2,153.9 161,154.1 155,154.4 179.4,154.4 196.3,154.5 189.9,154.6 188.9,154.7 192.2,154.7 198.8,154.7 164.5,155 176.8,155 54.2,155.5 103,155.5 67.6,155.7 85,155.9 95.6,155.9 77.9,156 130.5,156 197,156 165.3,156.2 174.6,156.2 199.3,156.2 159.2,156.4 193.1,156.4 189.4,156.5 175.6,156.7 177.2,156.7 129.6,156.8 142.8,156.9 6.6,157.4 11.5,157.4 16.4,157.4 21.3,157.4 26.2,157.4 31.1,157.4 36,157.4 40.9,157.4 45.8,157.4 50.7,157.4 55.6,157.4 60.5,157.4 65.4,157.4 70.4,157.4 116.7,157.4 122.8,157.4 125.8,157.4 1.7,157.6 103.1,158.4 159.2,158.4 93.9,158.5 137.3,158.5 142.2,158.5 145.4,158.5 147,158.5 150.5,158.5 153.8,158.5 157,158.5 161.8,158.5 176.6,158.5 179.3,158.5 182,158.5 184.7,158.5 187.4,158.5 190.1,158.5 192.8,158.5 196.9,158.5 199.6,158.5 132.7,158.7 165.5,158.8 130.1,158.9 177.9,158.9 79.2,159
  other v2: 46.9,16.6 1.7,18.4 89.9,18.4 134,18.4 178.1,18.4 222.2,18.4 266.3,18.4 310.4,18.4 3,20 47.1,20 91.2,20 135.3,20 179.4,20 223.5,20 267.6,20 311.7,20 1.7,20.3 45.8,20.3 89.9,20.3 134,20.3 178.1,20.3 222.2,20.3 266.3,20.3 310.4,20.3 1.7,22.4 45.8,22.4 89.9,22.4 134,22.4 178.1,22.4 222.2,22.4 266.3,22.4 310.4,22.4 9.8,22.5 53.9,22.5 98,22.5 142.1,22.5 186.2,22.5 230.3,22.5 274.4,22.5 318.5,22.5 8.6,31.7 52.7,31.7 96.8,31.7 140.9,31.7 185,31.7 229.1,31.7 273.2,31.7 317.3,31.7 1.8,32.3 45.9,32.3 90,32.3 134.1,32.3 178.2,32.3 222.3,32.3 266.4,32.3 310.5,32.3 13.6,33.3 57.7,33.3 101.8,33.3 145.9,33.3 190,33.3 234.1,33.3 278.2,33.3 322.3,33.3 8.6,34.2 52.7,34.2 96.8,34.2 140.9,34.2 185,34.2 229.1,34.2 273.2,34.2 317.3,34.2 15.6,35.1 59.7,35.1 103.8,35.1 147.9,35.1 192,35.1 236.1,35.1 280.2,35.1 324.3,35.1 17.8,35.2 61.9,35.2 106,35.2 150.1,35.2 194.2,35.2 238.3,35.2 282.4,35.2 326.5,35.2 25,35.8 69.1,35.8 113.2,35.8 157.3,35.8 201.4,35.8 245.5,35.8 289.6,35.8 333.7,35.8 10.9,38.9 55,38.9 99.1,38.9 143.2,38.9 187.3,38.9 231.4,38.9 275.5,38.9 319.6,38.9 24.9,39.5 69,39.5 113.1,39.5 157.2,39.5 201.3,39.5 245.4,39.5 289.5,39.5 333.6,39.5 18.8,41.8 20.9,41.8 62.9,41.8 65,41.8 107,41.8 109.1,41.8 151.1,41.8 153.2,41.8 195.2,41.8 197.3,41.8 239.3,41.8 241.4,41.8 283.4,41.8 285.5,41.8 327.5,41.8 329.6,41.8 25,41.9 69.1,41.9 113.2,41.9 157.3,41.9 201.4,41.9 245.5,41.9 289.6,41.9 333.7,41.9 7.3,42.1 51.4,42.1 95.5,42.1 139.6,42.1 183.7,42.1 227.8,42.1 271.9,42.1 316,42.1 4.4,44.1 48.5,44.1 92.6,44.1 136.7,44.1 180.8,44.1 224.9,44.1 269,44.1 313.1,44.1 14.7,45.2 58.8,45.2 102.9,45.2 147,45.2 191.1,45.2 235.2,45.2 279.3,45.2 323.4,45.2 25.5,46.6 69.6,46.6 113.7,46.6 157.8,46.6 201.9,46.6 246,46.6 290.1,46.6 334.2,46.6 14.6,47.4 58.7,47.4 102.8,47.4 146.9,47.4 191,47.4 235.1,47.4 279.2,47.4 323.3,47.4 9.2,49 53.3,49 97.4,49 141.5,49 185.6,49 229.7,49 273.8,49 317.9,49 14.8,49.5 58.9,49.5 103,49.5 147.1,49.5 191.2,49.5 235.3,49.5 279.4,49.5 323.5,49.5 25.6,50.1 69.7,50.1 113.8,50.1 157.9,50.1 202,50.1 246.1,50.1 290.2,50.1 334.3,50.1 23.3,50.6 67.4,50.6 111.5,50.6 155.6,50.6 199.7,50.6 243.8,50.6 287.9,50.6 332,50.6 25.7,52.7 69.8,52.7 113.9,52.7 158,52.7 202.1,52.7 246.2,52.7 290.3,52.7 334.4,52.7 16.3,53.5 60.4,53.5 104.5,53.5 148.6,53.5 192.7,53.5 236.8,53.5 280.9,53.5 325,53.5 25.8,55.1 69.9,55.1 114,55.1 158.1,55.1 202.2,55.1 246.3,55.1 290.4,55.1 334.5,55.1 4,55.9 48.1,55.9 92.2,55.9 136.3,55.9 180.4,55.9 224.5,55.9 268.6,55.9 312.7,55.9 12.696,56.4 56.796,56.4 100.896,56.4 144.996,56.4 189.096,56.4 233.196,56.4 277.296,56.4 321.396,56.4 3.9,57.8 48,57.8 92.1,57.8 136.2,57.8 180.3,57.8 224.4,57.8 268.5,57.8 312.6,57.8 7.3,58.1 51.4,58.1 95.5,58.1 139.6,58.1 183.7,58.1 227.8,58.1 271.9,58.1 316,58.1 26.3,58.5 70.4,58.5 114.5,58.5 158.6,58.5 202.7,58.5 246.8,58.5 290.9,58.5 335,58.5 12.8,62.4 56.9,62.4 101,62.4 145.1,62.4 189.2,62.4 233.3,62.4 277.4,62.4 321.5,62.4 8.1,63.1 52.2,63.1 96.3,63.1 140.4,63.1 184.5,63.1 228.6,63.1 272.7,63.1 316.8,63.1 1.8,64.1 45.9,64.1 90,64.1 134.1,64.1 178.2,64.1 222.3,64.1 266.4,64.1 310.5,64.1 23.4,65 67.5,65 111.6,65 155.7,65 199.8,65 243.9,65 288,65 332.1,65 15.5,66.7 20.6,66.7 59.6,66.7 64.7,66.7 103.7,66.7 108.8,66.7 147.8,66.7 152.9,66.7 191.9,66.7 197,66.7 236,66.7 241.1,66.7 280.1,66.7 285.2,66.7 324.2,66.7 329.3,66.7 18.5,66.8 62.6,66.8 106.7,66.8 150.8,66.8 194.9,66.8 239,66.8 283.1,66.8 327.2,66.8 7.8,67 51.85,67 96,67 140.05,67 184.15,67 228.6,67 272.4,67 316.55,67 8.1,69.2 52.2,69.2 96.3,69.2 140.4,69.2 184.5,69.2 228.6,69.2 272.7,69.2 316.8,69.2 46.9,69.3 91,69.3 135.1,69.3 179.2,69.3 223.3,69.3 267.4,69.3 311.4,69.3
GND_IN: C1-1.2 C1-3.1 C1-5.1 C1-8.1 C3-2.1 C6-1.2 H1.1 H1.20 Iso-1.1 Iso-1.7 Iso-2.8 Iso-3.8 OpAmp-1.9 OpAmp-1.14 OpAmp-1.15 R2-8.2 RPD_1.2 RPD_2.2 RPD_3.2 RPD_4.2 RPD_5.2 RPD_6.2 RPD_7.2 RPD_8.2 RPD_9.2 | length 2.9
  Top Layer w0.3: Iso-1.1@187.58,166 187.58,168.28 187.9,168.6 C1-1.2@187.9,168.8
  other v1: 134.9,163.6 138.9,163.6 143,163.6 131.7,163.7 147.2,163.7 152.9,163.7 158.6,163.7 164.3,163.7 167.2,163.7 178.6,163.7 184.3,163.7 190,163.7 155.2,164.2 161.9,164.9 176.6,165.2 142.6,166 164.9,166.2 156.2,169 164.9,169.4 189.8,169.5 166.7,170 163,170.4 173.7,170.5 175.6,170.8 132.7,171.2 143.5,173 141.2,173.2 141.7,174.9 189.8,175.2 132.4,175.3 154.9,176 150.5,176.3 152.8,176.3 160.9,176.5 144.4,176.7 148.8,176.7 182.3,177.9 132.2,178.2 153,178.2 189.3,178.2 151,178.9 154.1,179.9 152.7,180.5 135.4,180.7 142.5,180.8 189.8,181 144.2,182.2 169.1,182.6 187.8,183.1 132.4,183.5 137.9,183.7 189.8,183.9